# Altium PCB Membrane_Board.PcbDoc (part 2 of 5)
Units mm, origin at the board's own origin, x right, y up, seen from the top; angles counter-clockwise.
Board outline 303 x 126.06 mm, 2 copper layers (Top Layer, Bottom Layer), stack 1.499 mm thick; 248 components, 169 nets, 1258 pads, 728 vias.
Unrouted connection lines stored in the file: 317.
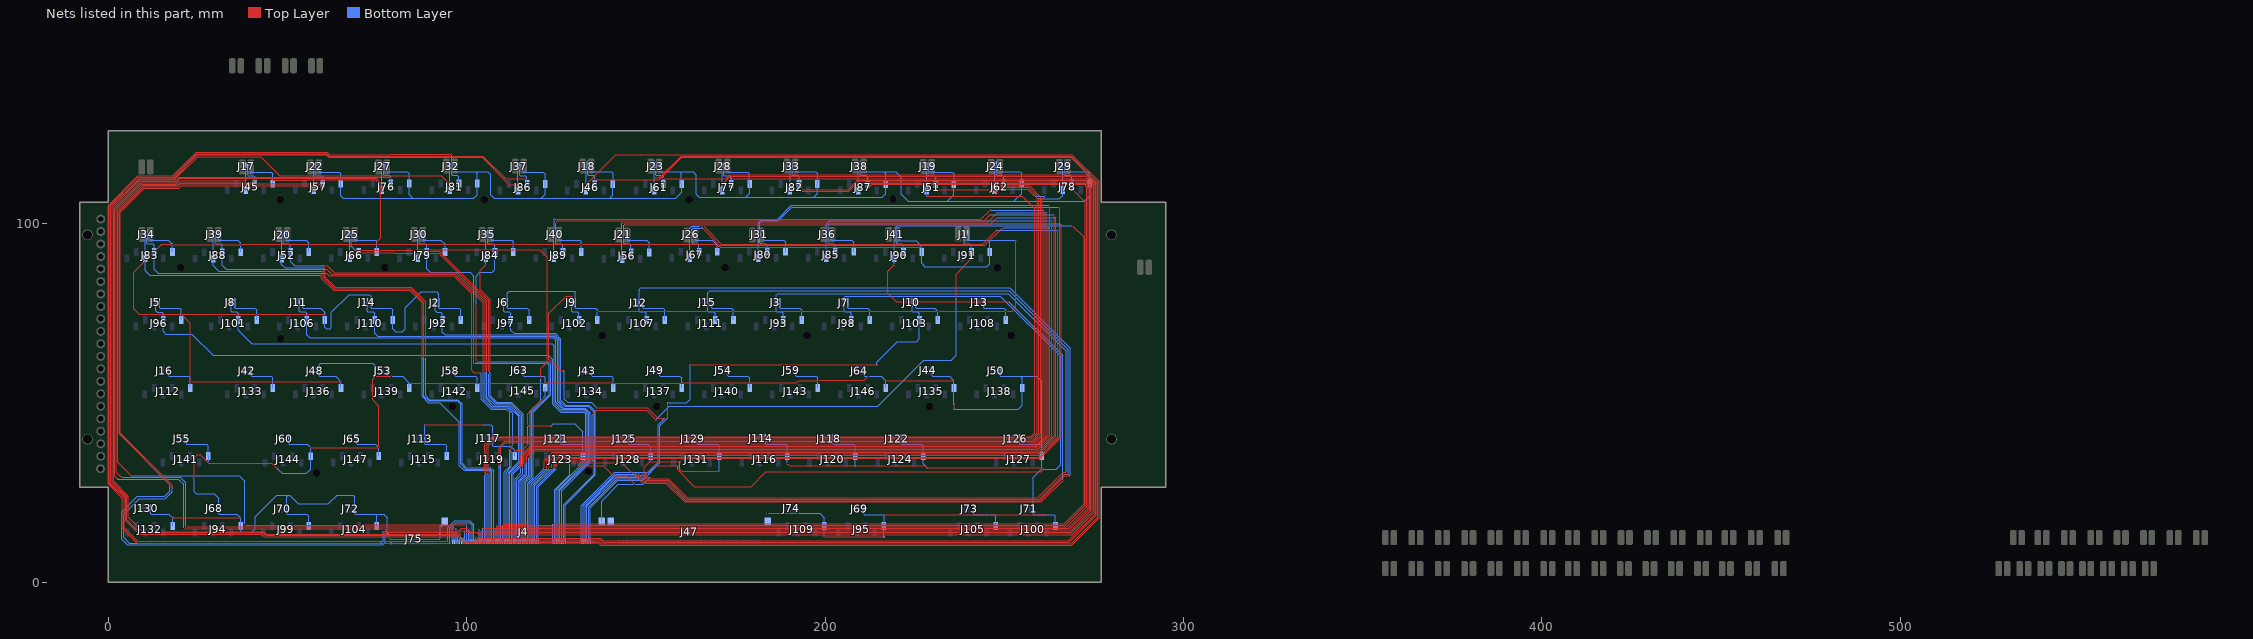
[diagram p2: the nets of this part, all layers, seen from the top]

## Via types
v1: diameter 0.4, hole 0.2, Top Layer to Bottom Layer, tented both sides, 724 vias
v2: diameter 0.4, hole 0.2, Top Layer to Bottom Layer, 3 vias
v3: diameter 0.6, hole 0.3, Top Layer to Bottom Layer, 1 vias

## Nets (pads, with @x,y where several pads share a name; then routed paths per layer and width w, separated by ;. In a path a pad name is that pad's centre, name@x,y a point inside that pad or via, vN(x,y) a via of type N, cw(c..) or ccw(c..) an arc to the next point about the centre after c; other vN are vias at no path point) (continued)
GND: J1.6 J2.6 J3.6 J4.MP1 J4.MP2 J5.6 J6.6 J7.6 J8.6 J9.6 J10.6 J11.6 J12.6 J13.6 J14.6 J15.6 J16.6 J17.6 J18.6 J19.6 J20.6 J21.6 J22.6 J23.6 J24.6 J25.6 J26.6 J27.6 J28.6 J29.6 J30.6 J31.6 J32.6 J33.6 J34.6 J35.6 J36.6 J37.6 J38.6 J39.6 J40.6 J41.6 J42.6 J43.6 J44.6 J45.6 J46.6 J47.MP1 J47.MP2 J48.6 J49.6 J50.6 J51.6 J52.6 J53.6 J54.6 J55.6 J56.6 J57.6 J58.6 J59.6 J60.6 J61.6 J62.6 J63.6 J64.6 J65.6 J66.6 J67.6 J68.6 J69.6 J70.6 J71.6 J72.6 J73.6 J74.6 J75.26 J75.MP1 J75.MP2 J76.6 J77.6 J78.6 J79.6 J80.6 J81.6 J82.6 J83.6 J84.6 J85.6 J86.6 J87.6 J88.6 J89.6 J90.6 J91.6 J92.6 J93.6 J94.6 J95.6 J96.6 J97.6 J98.6 J99.6 J100.6 J101.6 J102.6 J103.6 J104.6 J105.6 J106.6 J107.6 J108.6 J109.6 J110.6 J111.6 J112.6 J113.6 J114.6 J115.6 J116.6 J117.6 J118.6 J119.6 J120.6 J121.6 J122.6 J123.6 J124.6 J125.6 J126.6 J127.6 J128.6 J129.6 J130.6 J131.6 J132.6 J133.6 J134.6 J135.6 J136.6 J137.6 J138.6 J139.6 J140.6 J141.6 J142.6 J143.6 J144.6 J145.6 J146.6 J147.6 | length 2420.8
  Top Layer w0.203: v1@36.819,94.259 36.824,94.265 55.886,94.265 v1(55.905,94.285) v1(74.905,94.285) ; v1(45.876,112.22) 55.295,112.22 55.371,112.297 64.737,112.297 64.813,112.22 v1(64.866,112.22) ; v1@64.866,112.297 74.45,112.297 76.042,110.705 76.042,96.108 74.905,94.971 v1(74.905,94.285) ; v1(78.328,11.95) 78.332,11.946 v1(92.632,11.946) ; v1(116.936,43.7) 116.936,47.05 v1(121.167,51.28) ; v1(130.957,32.473) 138.094,32.473 140.888,29.679 144.444,29.679 v1(146.832,27.291) ; v1(151.175,29.349) 150.21,29.349 149.55,30.009 149.55,32.143 v1(151.074,33.667) v1(159.469,33.667) ; v1(159.469,31.47) 159.964,30.974 v1(170.368,30.974) ; v1(188.9,93.501) 170.743,93.501 170.529,93.715 v1(169.858,93.715) 169.306,94.266 150.89,94.266 v1(150.871,94.285) v1(131.914,94.285) v1(112.923,94.285) v1(93.898,94.285) v1(74.905,94.285) ; v1@188.9,93.592 188.991,93.501 v1(207.905,93.501) ; v1@207.905,93.592 207.996,93.501 v1(226.929,93.501)
  Top Layer w0.254: v1@17.902,17.969 v1(36.849,17.969) ; v1(23.954,28.968) 23.954,34.766 24.734,35.546 25.674,35.546 v1(27.96,33.26) 45.613,33.26 v1(47.264,31.609) ; v1(36.829,94.246) 17.884,94.246 v1(17.859,94.271) 14.904,94.271 7.112,86.479 7.112,76.257 8.631,74.738 v1(20.364,74.738) ; v1(56.383,37.527) v1(75.407,37.527) 75.407,49.186 73.705,50.888 73.705,56.65 v1(74.522,57.466) v1(78.938,57.466) ; v1(60.421,74.738) v1(41.346,74.738) v1(20.364,74.738) ; v1(64.892,56.019) v1(45.918,56.019) v1(22.871,56.019) 22.871,72.232 v1(20.364,74.738) ; v1(83.942,55.57) 83.954,55.583 102.928,55.583 v1(102.941,55.596) 121.897,55.596 v1(121.923,55.621) 140.879,55.621 v1(140.904,55.596) 159.913,55.596 v1(159.938,55.621) v1(178.936,55.621) 191.926,55.621 192.603,56.298 197.911,56.298 v1(197.937,56.323) 210.865,56.323 v1(212.034,57.492) ; v1@88.234,43.928 v1(88.244,43.928) v1(104.643,43.928) ; v1(113.363,36.842) 115.438,36.842 v1(116.936,38.34) ; v1(116.936,43.7) v1(123.489,43.7) ; v1(136.393,75.602) v1(155.239,75.602) v1(174.416,75.602) v1(193.416,75.602) v1(212.389,75.602) v1(231.389,75.602) v1(250.362,75.602) 252.191,75.602 253.131,76.542 v1(253.131,95.465) ; v1(183.865,19.189) 183.891,19.214 v1(192.273,19.214) ; v1(189.41,33.09) 190.053,32.447 v1(208.325,32.447) 227.934,32.447 v1(228.493,31.889) v1(260.394,31.889) ; v1(199.74,12.661) v3@216.393,12.661 ; v1(216.403,18.833) v1@245.98,18.833 ; v1(216.911,56.247) v1(235.91,56.247) ; v1(235.935,48.322) v1(235.935,49.719) ; v1(246.019,18.833) 261.88,18.833
  Bottom Layer w0.203: J94.6@36.849,15.729 36.849,14.237 37.155,13.931 39.974,13.931 40.914,14.871 40.914,18.223 47.01,24.319 50.236,24.319 ; J70.6@49.755,20.568 49.755,23.838 50.236,24.319 ; J57.6@64.865,111.207 64.865,107.912 65.577,107.2 84.856,107.2 ; J72.6@68.77,20.568 68.77,23.862 68.313,24.319 63.799,24.319 61.386,21.906 52.928,21.906 50.515,24.319 50.236,24.319 ; J76.6@83.9,111.311 83.9,108.155 84.856,107.2 ; v1@92.632,11.972 92.632,15.836 92.658,15.861 92.908,15.861 92.794,15.976 ; 92.933,15.417 92.933,15.836 ; J81.6@102.874,111.258 102.874,109.251 102.882,109.243 102.882,108.182 101.899,107.2 84.856,107.2 ; v1(121.167,51.28) 121.923,52.036 121.923,54.356 J145.6@121.915,54.364 ; v1(130.957,32.473) 132.345,33.86 J123.6@132.345,35.236 ; J4.MP2@137.631,16.965 137.631,22.662 142.26,27.291 v1(146.832,27.291) 149.118,27.291 v1(151.175,29.349) ; v1(151.074,33.667) 151.336,33.929 J128.6@151.336,35.236 J128.6@151.336,35.394 ; v1(159.469,31.47) v1(159.469,33.667) ; J90.6@226.926,92.208 226.926,88.954 227.833,88.048 245.028,88.048 245.9,88.92 J91.6@245.9,92.208
  Bottom Layer w0.254: J34.6@11.739,97.072 11.739,95.621 11.888,95.472 16.658,95.472 v1(17.859,94.271) J83.6@17.859,92.208 ; J130.6@11.756,20.593 11.756,19.142 11.905,18.993 16.853,18.993 v1(17.876,17.969) J132.6@17.876,15.729 ; J5.6@14.244,78.073 14.244,76.622 14.393,76.473 19.872,76.473 20.364,75.981 v1(20.364,74.738) J96.6@20.364,73.209 ; J16.6@16.751,59.074 16.751,57.623 16.899,57.474 22.379,57.474 22.871,56.982 v1(22.871,56.019) J112.6@22.871,54.21 ; J55.6@21.746,40.049 21.746,38.598 21.895,38.449 27.374,38.449 27.866,37.957 J141.6@27.866,35.185 27.96,35.092 v1(27.96,33.26) ; v1(23.954,28.968) 23.954,25.201 24.48,24.675 29.535,24.675 30.729,23.481 J68.6@30.729,20.593 30.729,19.142 30.877,18.993 35.825,18.993 v1(36.849,17.969) J94.6@36.849,15.729 ; J39.6@30.729,97.098 30.729,95.646 30.877,95.498 36.11,95.498 36.829,94.779 ; J8.6@35.226,78.073 35.226,76.622 35.375,76.473 40.854,76.473 41.346,75.981 v1(41.346,74.738) J101.6@41.346,73.209 ; J88.6@36.849,92.234 36.849,94.779 ; J17.6@39.756,116.072 39.756,114.62 39.905,114.471 45.384,114.471 45.876,113.979 v1(45.876,112.22) J45.6@45.876,111.207 ; J42.6@39.78,59.074 39.78,57.623 39.929,57.474 45.408,57.474 45.9,56.982 J133.6@45.9,54.21 ; v1(47.264,31.609) 48.509,30.365 55.138,30.365 56.383,31.609 J144.6@56.383,35.169 v1(56.383,37.527) 55.461,38.449 50.437,38.449 50.288,38.598 J60.6@50.288,40.049 ; J70.6@49.755,20.568 49.755,19.116 49.903,18.967 55.383,18.967 55.875,18.475 J99.6@55.875,15.703 ; J20.6@49.771,97.022 49.775,97.017 49.775,95.57 49.924,95.421 55.232,95.421 55.877,94.776 55.877,94.313 v1(55.905,94.285) J52.6@55.905,92.109 ; J11.6@54.266,78.073 54.266,76.622 54.415,76.473 59.245,76.473 60.386,75.332 J106.6@60.386,73.209 60.386,71.166 60.777,70.776 61.818,70.776 62.199,71.157 62.199,75.297 67.178,80.276 72.816,80.276 73.258,79.834 J14.6@73.258,78.073 73.258,76.622 73.406,76.473 78.886,76.473 79.378,75.981 J110.6@79.378,73.209 79.378,70.717 80.208,69.887 81.935,69.887 82.824,70.776 82.824,76.593 87.244,81.012 91.612,81.012 92.206,80.419 J2.6@92.206,78.048 92.206,76.596 92.355,76.448 97.834,76.448 98.326,75.956 J92.6@98.326,73.184 ; J22.6@58.745,116.072 58.745,114.62 58.894,114.471 64.373,114.471 64.865,113.979 v1@64.865,112.345 ; J57.6@64.865,111.207 64.866,111.209 v1(64.866,112.22) J57.6@64.866,112.297 ; J136.6@64.882,54.21 64.882,56.019 63.427,57.474 58.911,57.474 58.762,57.623 J48.6@58.762,59.074 58.762,60.659 59.278,61.175 73.68,61.175 74.522,60.333 v1(74.522,57.466) ; J72.6@68.77,20.568 68.77,19.116 68.919,18.967 74.112,18.967 74.119,18.96 74.405,18.96 ; J25.6@68.77,97.072 68.77,95.621 68.919,95.472 74.587,95.472 74.905,95.155 v1(74.905,94.285) 74.905,92.223 J66.6@74.89,92.208 ; J65.6@69.286,40.075 69.286,38.623 69.435,38.475 74.459,38.475 75.406,37.527 J147.6@75.406,35.211 ; J104.6@74.89,15.703 74.89,18.475 74.405,18.96 ; J27.6@77.78,116.097 77.78,114.646 77.929,114.497 83.408,114.497 83.9,114.005 J76.6@83.9,111.311 ; J53.6@77.822,59.049 77.822,57.597 77.97,57.448 v1@78.938,57.448 ; 78.1,12.889 77.795,13.194 77.795,18.02 76.855,18.96 74.405,18.96 ; v1(78.938,57.466) 82.046,57.466 v1(83.942,55.57) J139.6@83.942,54.184 ; J30.6@87.786,97.072 87.791,97.068 87.791,95.621 87.94,95.472 92.719,95.472 93.906,94.285 J79.6@93.906,92.208 ; J113.6@88.228,40.084 88.228,38.617 88.377,38.467 93.904,38.467 94.364,38.008 J115.6@94.364,35.236 ; J113.6@88.244,40.1 v1(88.244,43.928) ; J32.6@96.754,116.122 96.758,116.118 96.758,114.671 96.907,114.522 102.382,114.522 ; J58.6@96.821,59.074 96.821,57.623 96.97,57.474 102.449,57.474 102.941,56.982 v1(102.941,55.596) J142.6@102.941,54.21 ; J81.6@102.874,111.258 102.874,114.03 102.382,114.522 ; v1(104.643,43.928) 106.675,43.928 107.243,43.36 J117.6@107.243,40.126 107.243,38.083 107.392,37.934 112.271,37.934 v1(113.363,36.842) J119.6@113.363,35.261 ; J35.6@106.811,97.072 106.815,97.068 106.815,95.621 106.964,95.472 112.662,95.472 112.931,95.203 J84.6@112.931,92.208 ; J37.6@115.753,116.046 115.753,114.595 115.902,114.446 121.381,114.446 121.873,113.954 J86.6@121.873,111.182 ; J63.6@115.803,59.099 115.803,57.648 115.951,57.499 121.431,57.499 121.923,57.007 v1(121.923,55.621) ; v1(116.936,38.34) v1(116.936,43.7) ; J97.6@117.376,73.234 117.376,76.006 116.884,76.498 111.405,76.498 111.256,76.647 J6.6@111.256,78.099 111.256,80.59 111.831,81.165 130.093,81.165 130.273,80.985 J9.6@130.273,78.073 130.273,76.622 130.421,76.473 135.901,76.473 136.393,75.981 v1(136.393,75.602) J102.6@136.393,73.209 ; J86.6@121.889,111.166 121.889,108.266 120.746,107.123 ; v1(123.489,43.7) 124.048,44.258 130.068,44.258 132.345,41.982 132.345,38.008 ; J40.6@125.794,97.072 125.799,97.068 125.799,95.621 125.947,95.472 131.686,95.472 131.914,95.244 v1(131.914,94.285) J89.6@131.914,92.208 ; J121.6@126.225,40.1 126.225,38.649 126.373,38.5 131.853,38.5 132.345,38.008 ; J123.6@132.345,35.236 132.345,38.008 ; J18.6@134.751,116.122 134.751,114.671 134.9,114.522 140.379,114.522 140.871,114.03 J46.6@140.871,111.258 ; J43.6@134.784,59.074 134.784,57.623 134.933,57.474 140.412,57.474 140.904,56.982 v1(140.904,55.596) J134.6@140.904,54.21 ; J46.6@140.761,111.166 140.761,108.038 139.847,107.123 ; J21.6@144.741,97.072 144.746,97.068 144.746,95.621 144.894,95.472 150.168,95.472 150.861,94.779 J56.6@150.861,92.208 ; J125.6@145.216,40.1 145.216,38.649 145.365,38.5 150.508,38.5 151.336,37.672 J128.6@151.336,35.394 ; J12.6@149.119,77.997 149.119,76.546 149.268,76.397 154.747,76.397 155.239,75.905 v1(155.239,75.602) J107.6@155.239,73.133 ; J23.6@153.768,116.097 153.768,114.646 153.916,114.497 159.396,114.497 ; J49.6@153.818,59.099 153.818,57.648 153.967,57.499 159.446,57.499 159.938,57.007 v1(159.938,55.621) J137.6@159.938,54.235 ; J26.6@163.758,97.098 163.758,95.577 163.907,95.428 168.504,95.428 169.878,94.054 J67.6@169.878,92.234 ; J129.6@164.248,40.1 164.248,38.649 164.397,38.5 169.876,38.5 170.368,38.008 J131.6@170.368,35.236 v1(170.368,30.974) ; J15.6@168.279,78.073 168.279,76.622 168.428,76.473 173.907,76.473 174.399,75.981 J111.6@174.399,73.209 ; J28.6@172.7,116.021 172.7,114.569 172.849,114.421 178.328,114.421 178.82,113.929 J77.6@178.82,111.157 ; J54.6@172.816,59.099 172.816,57.648 172.965,57.499 178.444,57.499 178.936,57.007 v1(178.936,55.621) J140.6@178.936,54.235 ; J77.6@178.912,111.166 178.912,108.495 177.82,107.403 ; J31.6@182.8,97.098 182.8,95.646 182.949,95.498 188.428,95.498 188.92,95.006 188.92,93.521 v1(188.9,93.501) ; J114.6@183.29,40.126 183.29,38.674 183.439,38.525 188.918,38.525 189.41,38.033 J116.6@189.41,35.261 v1(189.41,33.09) ; J47.MP2@183.865,17.009 J47.MP2@183.91,16.965 ; J3.6@187.28,78.073 187.28,76.622 187.428,76.473 192.908,76.473 193.4,75.981 J93.6@193.4,73.209 ; J80.6@188.92,92.234 v1@188.92,93.501 ; J33.6@191.75,116.122 191.75,114.671 191.899,114.522 197.378,114.522 197.87,114.03 J82.6@197.87,111.258 ; J59.6@191.815,59.099 191.815,57.648 191.964,57.499 197.443,57.499 197.935,57.007 J143.6@197.935,54.235 ; v1(192.273,19.214) 198.521,19.214 199.758,17.977 J109.6@199.758,15.729 199.74,15.711 v1(199.74,12.661) ; J82.6@197.759,111.166 197.759,108.419 196.743,107.403 ; J36.6@201.782,97.098 201.782,95.646 201.93,95.498 207.41,95.498 207.905,95.002 v1(207.905,93.501) ; J118.6@202.197,40.1 202.197,38.649 202.346,38.5 207.825,38.5 208.317,38.008 J120.6@208.317,35.236 ; J7.6@206.279,78.048 206.279,76.596 206.428,76.448 211.907,76.448 212.399,75.956 J98.6@212.399,73.184 ; J85.6@207.902,92.234 v1@207.902,93.501 ; v1(208.325,32.447) J120.6@208.325,35.228 ; J38.6@210.705,116.122 210.705,114.671 210.854,114.522 216.333,114.522 ; J69.6@210.807,20.568 210.807,19.085 211.058,18.833 v1(216.403,18.833) 216.403,15.738 J95.6@216.393,15.729 v3(216.393,12.67) ; J64.6@210.807,59.074 210.829,59.052 210.829,57.641 210.978,57.492 v1(212.034,57.492) 215.666,57.492 v1(216.911,56.247) 216.911,54.226 J146.6@216.927,54.21 ; J87.6@216.825,111.258 216.825,114.03 216.333,114.522 ; J87.6@216.885,111.166 216.885,108.393 215.895,107.403 196.743,107.403 ; J41.6@220.806,97.072 220.811,97.067 220.811,95.622 221.158,95.275 225.355,95.275 226.529,94.101 226.529,93.922 226.929,93.521 v1(226.929,93.501) ; J122.6@221.23,40.075 221.23,38.623 221.379,38.475 226.858,38.475 227.35,37.983 J124.6@227.35,35.211 227.35,33.032 v1(228.493,31.889) ; J10.6@225.261,78.073 225.261,76.622 225.409,76.473 230.51,76.473 231.381,75.602 J103.6@231.381,73.209 ; J90.6@226.926,92.208 v1@226.926,93.501 ; J44.6@229.814,59.099 229.814,57.648 229.963,57.499 234.682,57.499 v1@235.934,56.247 ; J19.6@229.815,116.046 229.815,114.595 229.964,114.446 235.443,114.446 235.935,113.954 J51.6@235.935,111.182 ; J51.6@235.884,111.166 235.91,111.141 235.91,108.097 234.086,106.274 ; v1(235.91,56.247) 235.91,54.259 J135.6@235.934,54.235 v1@235.934,49.719 ; v1(235.935,48.322) 253.918,48.322 254.934,49.338 J138.6@254.934,54.21 254.934,56.982 254.442,57.474 ; J1.6@239.78,97.072 239.78,95.621 239.929,95.472 245.408,95.472 ; J73.6@241.423,20.568 241.423,18.982 241.572,18.833 v1(246.019,18.833) 247.185,18.833 247.543,18.475 J105.6@247.543,15.729 ; J13.6@244.242,78.073 244.242,76.622 244.391,76.473 249.87,76.473 250.362,75.981 v1(250.362,75.602) J108.6@250.362,73.209 ; J91.6@245.9,92.208 245.9,94.98 245.408,95.472 ; J24.6@248.73,116.148 248.73,114.696 248.879,114.548 254.358,114.548 254.85,114.056 J62.6@254.85,111.284 254.85,108.462 252.789,106.401 ; J50.6@248.814,59.074 248.814,57.623 248.963,57.474 254.442,57.474 ; v1(253.131,95.465) 253.124,95.472 245.408,95.472 ; J126.6@254.274,40.075 254.274,38.623 254.423,38.475 259.902,38.475 260.394,37.983 ; J71.6@258.085,20.577 258.085,18.982 258.234,18.833 v1(262.097,18.833) 263.857,18.833 264.205,18.485 J100.6@264.205,15.791 ; J71.6@258.095,20.568 258.095,29.359 260.394,31.659 v1(260.394,31.889) J127.6@260.394,35.211 260.394,37.983 ; J29.6@267.737,116.122 267.737,114.671 267.886,114.522 273.365,114.522 273.857,114.03 J78.6@273.857,111.258 273.908,111.207 273.908,107.843 272.466,106.401 ; 272.466,106.274 234.086,106.274 ; 102.382,114.522 105.88,114.522 106.649,113.753 106.649,108.089 107.614,107.123 120.746,107.123 ; 120.746,107.123 139.847,107.123 ; 139.847,107.123 158.262,107.123 159.938,108.8 J61.6@159.938,111.166 159.938,111.182 159.888,111.233 159.888,114.005 159.396,114.497 ; 159.396,114.497 163.131,114.497 164.028,113.6 164.028,108.266 164.891,107.403 177.82,107.403 ; 177.82,107.403 196.743,107.403 ; 216.333,114.522 219.716,114.522 221.183,113.055 221.183,108.229 223.139,106.274 234.086,106.274 ; 254.442,57.474 259.042,57.474 260.394,56.122 260.394,37.983
I2C1.SCL_1: J4.9 J17.4 J45.4 | length 235
  Top Layer w0.203: v1(6.319,29.74) 2.565,33.494 2.565,103.657 9.652,110.744 19.05,110.744 19.837,111.531 40.066,111.531 v1(40.755,112.22) ; v1(37.942,16.039) 37.98,16.001 38.342,16.001 38.425,15.918 69.118,15.918 69.217,16.017 v1(99.969,16.017)
  Bottom Layer w0.203: v1(6.319,29.74) 36.484,29.74 37.968,28.256 37.968,16.064 v1(37.942,16.039) ; J4.9@99.969,11.327 99.975,11.333 99.975,16.011 v1(99.969,16.017)
  Bottom Layer w0.254: J17.4@38.756,116.072 38.756,113.655 38.905,113.506 40.349,113.506 40.755,113.1 J45.4@40.755,111.249
I2C1.SCL_2: J4.10 J22.4 J57.4 | length 279.2
  Top Layer w0.203: v1(17.163,26.596) 17.163,27.185 2.946,41.402 2.946,103.5 9.784,110.338 19.253,110.338 20.066,111.15 58.612,111.15 v1(59.743,110.019) ; v1(77.211,13.934) 97.28,13.934 98.394,15.048 v1(100.481,15.048)
  Bottom Layer w0.203: J4.10@100.481,11.315 v1(100.481,15.048) v1@100.481,15.062
  Bottom Layer w0.254: v1(17.163,26.596) 17.163,25.384 15.766,23.987 8.095,23.987 3.652,19.544 3.652,12 5.202,10.451 76.499,10.451 77.211,11.162 v1(77.211,13.934) ; J22.4@57.745,116.072 57.745,113.655 57.894,113.506 59.337,113.506 59.743,113.1 J57.4@59.743,111.249
I2C1.SCL_3: J4.11 J27.4 J76.4 | length 276.4
  Top Layer w0.203: v1(78.779,112.739) 78.749,112.739 78.407,113.081 19.705,113.081 18.511,111.887 8.941,111.887 1.422,104.369 1.422,28.154 5.563,24.014 5.563,18.147 9.55,14.159 43.302,14.159 44.006,13.455 97.461,13.455 98.445,14.439 v1(100.985,14.439)
  Bottom Layer w0.203: J4.11@100.981,11.315 100.981,14.435 v1(100.985,14.439)
  Bottom Layer w0.254: J27.4@76.78,116.097 76.78,113.68 76.929,113.532 78.372,113.532 78.779,113.125 v1(78.779,112.739) J76.4@78.779,111.274
I2C1.SCL_4: J4.12 J32.4 J81.4 | length 312.7
  Top Layer w0.203: v1(95.27,10.959) 7.964,10.959 3.912,15.011 3.912,23.47 -0.102,27.483 -0.102,105.091 8.219,113.411 17.88,113.411 24.484,120.015 61.047,120.015 61.758,119.304 78.667,119.304 78.765,119.402 v1(95.727,119.402)
  Bottom Layer w0.203: v1@95.27,11.01 95.27,15.023 96.87,16.623 100.807,16.623 101.481,15.949 J4.12@101.481,11.315 ; v1(95.727,119.402) 95.727,117.817 95.741,117.803 95.741,116.136 J32.4@95.754,116.122
  Bottom Layer w0.254: J32.4@95.754,116.122 95.754,113.706 95.903,113.557 97.346,113.557 97.753,113.151 J81.4@97.753,111.3
I2C1.SCL_5: J4.13 J37.4 J86.4 | length 332.3
  Top Layer w0.203: v1(94.686,11.442) 8.116,11.442 4.343,15.215 4.343,23.577 0.279,27.641 0.279,104.933 8.377,113.03 18.038,113.03 24.642,119.634 60.889,119.634 61.6,118.923 104.47,118.923 110.799,112.594 v1(116.768,112.594)
  Bottom Layer w0.203: v1@94.686,11.492 94.686,15.201 96.674,17.189 100.825,17.189 101.981,16.033 J4.13@101.981,11.315
  Bottom Layer w0.254: J37.4@114.753,116.046 114.753,113.63 114.902,113.481 116.345,113.481 116.752,113.074 J86.4@116.752,111.223
I2C1.SCL_6: J4.14 J18.4 J46.4 | length 423.4
  Top Layer w0.203: v1(102.484,12.585) 102.484,11.974 102.635,11.823 137.18,11.823 137.859,11.143 268.149,11.143 275.666,18.661 275.666,111.392 268.491,118.567 248.762,118.567 248.743,118.548 190.742,118.548 190.723,118.567 172.721,118.567 172.702,118.548 171.674,118.548 171.655,118.567 159.969,118.567 153.732,112.33 v1(135.75,112.33)
  Bottom Layer w0.203: v1@102.433,12.686 102.457,12.662 102.457,11.339 J4.14@102.48,11.316
  Bottom Layer w0.254: J18.4@133.751,116.122 133.751,113.706 133.9,113.557 135.343,113.557 135.75,113.151 v1(135.75,112.33) J46.4@135.75,111.3
I2C1.SCL_7: J4.15 J23.4 J61.4 | length 397.5
  Top Layer w0.203: v1(102.992,12.305) 137.332,12.305 138.113,11.524 267.844,11.524 275.285,18.965 275.285,111.234 272.828,113.69 173.38,113.69 172.325,112.635 v1(154.808,112.635)
  Bottom Layer w0.203: J4.15@102.981,11.315 v1@102.981,12.432
  Bottom Layer w0.254: J23.4@152.768,116.097 152.768,113.68 152.916,113.532 154.36,113.532 154.78,113.112 154.78,112.663 v1(154.808,112.635) J61.4@154.808,111.316
I2C1.SCL_8: J4.16 J28.4 J77.4 | length 376.7
  Top Layer w0.203: v1(103.474,14.617) 103.474,13.989 103.71,13.753 268.65,13.753 274.523,19.626 274.523,110.918 272.89,112.551 v1(173.732,112.551)
  Bottom Layer w0.203: J4.16@103.474,11.322 v1(103.474,14.617)
  Bottom Layer w0.254: J28.4@171.7,116.021 171.7,113.604 171.849,113.455 173.292,113.455 173.699,113.049 v1@173.699,112.584 ; J77.4@173.699,111.198 173.732,111.231 v1(173.732,112.551)
I2C1.SCL_9: J4.25 J33.4 J82.4 | length 353
  Top Layer w0.203: v1(107.995,14.642) 268.092,14.642 273.761,20.312 273.761,110.602 272.574,111.789 209.274,111.789 206.564,109.079 v1(192.749,109.079)
  Bottom Layer w0.203: J4.25@107.981,11.315 v1@107.981,14.656 ; J82.4@192.679,111.166 192.749,111.096 v1(192.749,109.079)
  Bottom Layer w0.254: J33.4@190.75,116.122 190.75,113.706 190.899,113.557 192.342,113.557 192.749,113.151 J82.4@192.749,111.3
I2C1.SCL_10: J4.26 J38.4 J87.4 | length 330.8
  Top Layer w0.203: v1(108.478,15.702) 116.314,15.702 116.511,15.506 267.38,15.506 272.999,21.124 272.999,110.287 272.259,111.027 213.152,111.027 v1(211.78,109.655)
  Bottom Layer w0.203: v1@108.478,15.728 108.481,15.725 J4.26@108.481,11.315
  Bottom Layer w0.254: J38.4@209.705,116.122 209.705,113.706 209.854,113.557 211.297,113.557 211.805,113.049 J87.4@211.805,111.166 ; v1(211.78,109.655) J87.4@211.78,111.166
I2C1.SCL_11: J4.27 J19.4 J51.4 | length 284.5
  Top Layer w0.203: v1(109.011,32.168) 109.011,37.812 110.581,39.382 258.025,39.382 260.192,41.549 260.192,107.473 257.019,110.646 248.975,110.646 247.89,109.562 v1(230.814,109.562)
  Bottom Layer w0.203: J4.27@108.983,11.317 109.009,11.342 109.009,32.14 v1@109.037,32.168
  Bottom Layer w0.254: J19.4@228.815,116.046 228.815,113.63 228.964,113.481 230.407,113.481 230.814,113.074 v1(230.814,109.562)
I2C1.SCL_12: J4.28 J24.4 J62.4 | length 266.4
  Top Layer w0.203: v1(109.519,32.752) 109.519,37.705 110.764,38.95 258.228,38.95 260.624,41.346 260.624,106.827 v1(261.468,107.671)
  Top Layer w0.254: v1(249.78,109.667) 256.449,109.667 v1(258.42,107.696)
  Bottom Layer w0.203: J4.28@109.481,11.315 109.5,11.334 109.5,32.733 v1(109.519,32.752)
  Bottom Layer w0.254: J24.4@247.73,116.148 247.73,113.731 247.879,113.582 249.315,113.582 249.78,113.118 v1(249.78,109.667) ; v1(258.42,107.696) 261.442,107.696 v1(261.468,107.671)
I2C1.SCL_13: J4.29 J29.4 J78.4 | length 267.9
  Top Layer w0.203: v1(109.981,16.196) 116.93,16.196 117.24,15.887 266.974,15.887 272.618,21.531 272.618,106.02 v1(268.808,109.83)
  Bottom Layer w0.203: J4.29@109.981,11.315 v1(109.981,16.196) v1@109.981,16.221
  Bottom Layer w0.254: J29.4@266.737,116.122 266.737,113.706 266.886,113.557 268.33,113.557 268.752,113.135 268.752,111.258 268.808,111.202 v1(268.808,109.83)
I2C1.SCL_14: J4.30 J34.4 J83.4 | length 180.6
  Top Layer w0.203: v1(60.929,86.168) 61.539,85.559 96.286,85.559 101.315,80.53 101.315,59.117 101.976,58.457 v1(104.075,58.457) ; v1(111.907,37.273) v1(111.907,38.442)
  Bottom Layer w0.203: J83.4@12.779,92.208 12.779,87.303 13.914,86.168 v1(60.929,86.168) ; v1(104.075,58.457) 104.075,51.072 106.85,48.297 111.018,48.297 111.907,47.408 v1(111.907,38.442) ; J4.30@110.483,11.317 110.483,30.871 111.907,32.295 v1(111.907,37.273)
  Bottom Layer w0.254: J34.4@10.739,97.072 10.739,94.656 10.888,94.507 12.331,94.507 12.737,94.101 J83.4@12.737,92.25 ; J83.4@12.779,92.208 J83.4@12.779,92.224
I2C1.SCL_15: J4.31 J39.4 J88.4 | length 161.9
  Top Layer w0.203: v1(60.929,87.286) 62.275,85.94 96.598,85.94 104.573,77.964 v1(104.573,58.882) ; v1(112.415,36.74) 112.415,38.01 112.821,38.416 v1(112.847,38.416)
  Bottom Layer w0.203: J88.4@31.745,92.275 31.745,88.413 32.872,87.286 v1(60.929,87.286) ; v1(104.573,58.882) 104.573,51.279 107.148,48.703 111.374,48.703 112.847,47.23 v1(112.847,38.416) ; J4.31@110.981,11.315 110.981,30.734 112.415,32.168 v1(112.415,36.74)
  Bottom Layer w0.254: J39.4@29.729,97.098 29.729,94.681 29.877,94.532 31.321,94.532 31.727,94.126 J88.4@31.727,92.275 ; J88.4@31.745,92.275 31.745,93.318
I2C1.SCL_16: J4.32 J20.4 J52.4 | length 142.6
  Top Layer w0.203: v1(59.889,88.294) 61.064,88.294 63.037,86.321 96.921,86.321 97.213,86.029 105.071,78.171 v1(105.071,58.457)
  Bottom Layer w0.203: J52.4@50.795,92.167 50.795,89.429 51.942,88.281 56.423,88.281 56.435,88.294 v1(59.889,88.294) ; v1@105.075,58.457 105.075,51.487 107.426,49.135 111.577,49.135 114.437,46.275 114.437,33.579 114.318,33.46 ; J4.32@111.483,11.317 111.483,30.627 114.317,33.46
  Bottom Layer w0.254: J20.4@48.771,97.022 48.771,94.605 48.919,94.456 50.363,94.456 50.769,94.05 J52.4@50.769,92.199
I2C1.SCL_17: J4.41 J25.4 J66.4 | length 142.6
  Top Layer w0.203: v1(68.834,92.685) 85.958,92.685 86.085,92.812 120.275,92.812 122.448,90.639 122.448,61.403 120.568,59.524 v1(120.568,56.831)
  Bottom Layer w0.203: J4.41@115.981,11.315 115.981,28.038 117.729,29.786 117.729,47.845 120.568,50.685 v1(120.568,56.831)
  Bottom Layer w0.254: J25.4@67.77,97.072 67.77,93.749 v1(68.834,92.685) 69.333,92.685 J66.4@69.81,92.208
I2C1.SCL_18: J4.42 J30.4 J79.4 | length 122.8
  Top Layer w0.203: v1(101.976,61.073) v1(101.976,78.04)
  Bottom Layer w0.203: J79.4@88.826,92.208 88.826,87.43 89.809,86.448 100.985,86.448 101.976,85.457 v1(101.976,78.04) ; v1(101.976,61.073) 122.473,61.073 122.956,60.591 122.956,52.392 118.11,47.546 118.11,29.506 116.481,27.878 J4.42@116.481,11.315
  Bottom Layer w0.254: J30.4@86.786,97.072 86.786,94.656 86.935,94.507 88.379,94.507 88.785,94.101 J79.4@88.785,92.25
I2C1.SCL_19: J4.43 J35.4 J84.4 | length 114.7
  Top Layer w0.254: v1(102.611,61.556) v1(102.611,77.507)
  Bottom Layer w0.203: v1(102.611,61.556) 122.727,61.556 123.439,60.845 123.439,52.336 118.491,47.388 118.491,29.227 116.964,27.7 J4.43@116.964,11.315
  Bottom Layer w0.254: v1(102.611,77.507) 102.611,85.457 103.601,86.448 107.157,86.448 107.851,87.142 J84.4@107.851,92.208 ; J35.4@105.811,97.072 105.811,94.656 105.96,94.507 107.403,94.507 107.81,94.101 J84.4@107.81,92.25
I2C1.SCL_20: J4.44 J40.4 J89.4 | length 380.8
  Top Layer w0.203: v1(121.635,31.711) 121.635,33.971 123.896,36.232 259.32,36.232 263.774,40.685 v1(263.774,102.526) ; v1(124.81,100.392) 125.267,100.85 244.419,100.85 v1(246.095,102.526)
  Bottom Layer w0.203: J4.44@117.481,11.315 117.481,27.557 v1(121.635,31.711) ; J40.4@124.794,97.072 124.794,100.376 v1(124.81,100.392) ; v1(246.095,102.526) v1(263.774,102.526)
  Bottom Layer w0.254: J40.4@124.794,97.072 124.794,94.656 124.943,94.507 126.386,94.507 126.793,94.101 J89.4@126.793,92.25
I2C1.SCL_21: J4.45 J21.4 J56.4 | length 360.8
  Top Layer w0.203: v1(122.321,31.711) 122.321,33.921 124.226,35.826 259.493,35.826 264.383,40.716 v1@264.383,101.662 ; v1@143.759,99.783 245.943,99.783 v1(247.873,101.713) v1@247.899,101.713
  Bottom Layer w0.203: J4.45@117.981,11.34 117.979,11.342 117.979,27.369 v1(122.321,31.711) ; J21.4@143.741,97.072 v1@143.741,99.765 ; v1@247.899,101.713 264.332,101.713 v1@264.383,101.662
  Bottom Layer w0.254: J21.4@143.741,97.072 143.741,94.656 143.89,94.507 145.333,94.507 145.74,94.101 J56.4@145.74,92.25
  other v1: 143.733,99.783 264.383,101.688
I2C1.SCL_22: J4.46 J26.4 J67.4 | length 340.5
  Top Layer w0.203: v1(122.981,31.736) 122.981,33.819 124.556,35.394 259.6,35.394 264.866,40.66 v1@264.866,98.259 ; v1(166.039,99.283) 170.96,94.361 243.968,94.361 v1(247.882,98.275)
  Bottom Layer w0.203: J4.46@118.486,11.319 118.486,27.19 v1@123.032,31.736 ; J26.4@162.758,97.098 162.791,97.131 162.791,98.514 163.069,98.792 165.548,98.792 v1(166.039,99.283) ; v1(247.882,98.275) 247.886,98.272 264.853,98.272 v1@264.86,98.265
  Bottom Layer w0.254: J26.4@162.758,97.098 162.758,94.951 163.176,94.532 164.35,94.532 164.756,94.126 J67.4@164.756,92.275
  other v1: 264.885,98.265
I2C1.SCL_23: J4.47 J31.4 J80.4 | length 328
  Top Layer w0.203: v1(123.667,31.736) 123.667,33.616 124.988,34.937 259.777,34.937 265.399,40.558 v1(265.399,104.66)
  Bottom Layer w0.203: J4.47@118.981,11.34 118.981,27.05 v1(123.667,31.736) ; J31.4@181.8,97.098 181.8,100.257 182.367,100.824 186.862,100.824 190.698,104.66 v1(265.399,104.66)
  Bottom Layer w0.254: J31.4@181.8,97.098 181.8,94.681 181.949,94.532 183.392,94.532 183.798,94.126 J80.4@183.798,92.275
I2C1.SCL_24: J4.48 J36.4 J85.4 | length 302.5
  Top Layer w0.203: v1(124.328,31.711) 124.328,33.438 125.445,34.556 259.955,34.556 265.907,40.508 v1@265.907,100.073
  Bottom Layer w0.203: J4.48@119.481,11.34 119.481,26.864 v1(124.328,31.711) ; J36.4@200.782,97.098 200.782,99.732 201.137,100.088 v1@265.806,100.088
  Bottom Layer w0.254: J36.4@200.782,97.098 200.782,94.681 200.93,94.532 202.374,94.532 202.78,94.126 J85.4@202.78,92.275
  other v1: 265.907,100.088
I2C1.SCL_25: J4.57 J41.4 J90.4 | length 292.4
  Top Layer w0.203: v1(123.981,16.366) 266.768,16.366 267.085,16.683 ; 267.085,16.709 272.237,21.861 272.237,96.247 v1(268.93,99.554)
  Bottom Layer w0.203: J4.57@123.981,11.315 v1(123.981,16.366) ; J41.4@219.806,97.072 219.806,99.199 220.162,99.554 v1(268.93,99.554)
  Bottom Layer w0.254: J41.4@219.806,97.072 219.806,94.849 220.148,94.507 221.398,94.507 221.805,94.101 J90.4@221.805,92.25
I2C1.SDA_1: J4.1 J17.3 J45.3 | length 231.6
  Top Layer w0.203: v1(3.627,29.261) 2.184,30.703 2.184,103.957 9.353,111.125 18.827,111.125 19.716,112.014 v1@38.244,112.014 ; v1(21.61,15.504) 67.25,15.504 ; 67.251,15.505 v1(96.515,15.506)
  Bottom Layer w0.203: v1(3.627,29.261) 20.072,29.261 21.61,27.723 v1(21.61,15.504) ; J4.1@95.981,11.315 95.981,14.972 v1(96.515,15.506)
  Bottom Layer w0.254: v1@38.247,112.112 38.247,109.417 J45.3@38.256,109.407 ; v1@38.252,112.056 38.252,116.067 J17.3@38.256,116.072
  other v1: 38.247,112.011
I2C1.SDA_2: J4.2 J22.3 J57.3 | length 269.2
  Top Layer w0.203: v1(17.736,26.198) 17.753,26.216 17.753,27.134 3.327,41.56 3.327,103.226 10.008,109.906 19.609,109.906 20.374,110.671 v1(57.245,110.671) ; v1(76.677,14.413) v1(96.489,14.413)
  Bottom Layer w0.203: J4.2@96.481,11.315 96.485,11.319 96.485,14.409 v1(96.489,14.413)
  Bottom Layer w0.254: v1(17.736,26.198) 17.736,25.22 15.793,23.278 8.58,23.278 4.236,18.935 4.236,12.534 5.862,10.908 75.864,10.908 76.677,11.721 v1(76.677,14.413) ; J57.3@57.245,109.407 J22.3@57.245,116.072
I2C1.SDA_3: J4.3 J27.3 J76.3 | length 272
  Top Layer w0.203: v1@2.652,28.768 2.652,28.788 1.803,29.636 1.803,104.115 9.195,111.506 18.669,111.506 19.863,112.7 74.694,112.7 76.264,111.129 v1(76.296,111.129) ; v1(21,14.971) 96.945,14.971 v1(96.972,14.998)
  Bottom Layer w0.203: v1(2.662,28.778) 19.513,28.778 21,27.291 v1(21,14.971) ; J4.3@96.981,11.315 v1@96.981,15.007
  Bottom Layer w0.254: J76.3@76.28,109.511 76.296,109.527 v1(76.296,111.129) ; v1@76.28,111.113 J27.3@76.28,116.097
I2C1.SDA_4: J4.4 J32.3 J81.3 | length 296.8
  Top Layer w0.203: v1(95.269,111.113) 92.92,113.462 47.803,113.462 42.469,118.796 24.881,118.796 18.353,112.268 8.692,112.268 1.041,104.617 1.041,27.996 5.156,23.881 5.156,17.45 8.788,13.818 8.788,13.778 43.124,13.778 43.829,13.074 97.994,13.074 v1(98.47,13.55)
  Bottom Layer w0.203: J4.4@97.481,11.315 97.481,12.56 v1(98.47,13.55)
  Bottom Layer w0.254: J81.3@95.254,109.458 J32.3@95.254,116.122
I2C1.SDA_5: J4.5 J37.3 J86.3 | length 315.3
  Top Layer w0.203: v1(97.988,12.356) 97.935,12.356 97.61,12.681 43.535,12.681 42.819,13.397 8.548,13.397 4.775,17.17 4.775,23.724 0.66,27.838 0.66,104.775 8.534,112.649 18.196,112.649 24.8,119.253 60.731,119.253 61.443,118.542 104.312,118.542 111.886,110.968 v1(114.269,110.968)
  Bottom Layer w0.203: J4.5@97.981,11.315 97.985,11.318 v1@97.985,12.356
  Bottom Layer w0.254: J86.3@114.253,109.382 J37.3@114.253,116.046
I2C1.SDA_6: J4.6 J18.3 J46.3 | length 434.2
  Top Layer w0.203: v1(98.47,12.762) 98.47,11.873 99.359,10.984 136.723,10.984 137.326,10.381 268.789,10.381 276.428,18.02 276.428,111.707 268.806,119.329 248.446,119.329 248.427,119.31 191.058,119.31 191.039,119.329 172.405,119.329 172.386,119.31 171.989,119.31 171.97,119.329 153.492,119.329 153.473,119.31 153.076,119.31 153.057,119.329 141.52,119.329 v1(133.251,111.06)
  Bottom Layer w0.203: J4.6@98.47,11.315 98.476,11.32 98.476,12.757 v1(98.47,12.762)
  Bottom Layer w0.254: J46.3@133.251,109.458 v1(133.251,111.06) J18.3@133.251,116.122
I2C1.SDA_7: J4.7 J23.3 J61.3 | length 412.8
  Top Layer w0.203: v1(98.978,12.331) 99.936,11.374 136.918,11.374 137.529,10.762 268.631,10.762 276.047,18.178 276.047,111.549 268.648,118.948 248.604,118.948 248.585,118.929 190.9,118.929 190.881,118.948 172.563,118.948 172.544,118.929 171.831,118.929 171.812,118.948 159.791,118.948 153.732,112.889 v1(152.258,112.889)
  Bottom Layer w0.203: v1(98.978,12.331) 98.98,12.329 98.98,11.316 J4.7@98.981,11.315 ; 152.258,117.715 152.263,117.711 152.263,116.102 J23.3@152.268,116.097
  Bottom Layer w0.254: J23.3@152.268,116.097 152.28,116.084 152.28,110.946 152.293,110.933 J61.3@152.293,109.458
I2C1.SDA_8: J4.8 J28.3 J77.3 | length 384.7
  Top Layer w0.203: v1(99.461,13.905) 102.687,13.905 103.322,13.27 268.803,13.27 274.904,19.372 274.904,111.076 272.743,113.237 173.478,113.237 v1(171.2,110.959)
  Bottom Layer w0.203: v1(99.461,13.905) 99.461,11.335 J4.8@99.481,11.315
  Bottom Layer w0.254: J77.3@171.2,109.357 v1(171.2,110.959) J28.3@171.2,116.021
I2C1.SDA_9: J4.17 J33.3 J82.3 | length 359.1
  Top Layer w0.203: v1(103.982,14.232) 107.727,14.232 107.8,14.159 268.32,14.159 274.142,19.981 274.142,110.76 272.732,112.17 208.995,112.17 206.4,109.576 191.735,109.576 v1(190.25,111.06)
  Bottom Layer w0.203: J4.17@103.981,11.315 v1(103.982,14.232)
  Bottom Layer w0.254: J82.3@190.25,109.458 v1(190.25,111.06) J33.3@190.25,116.122
I2C1.SDA_10: J4.18 J38.3 J87.3 | length 336.1
  Top Layer w0.203: v1(104.49,15.125) 267.812,15.125 273.38,20.693 273.38,110.445 272.417,111.408 209.571,111.408 v1(209.214,111.051)
  Bottom Layer w0.203: J4.18@104.481,11.315 v1@104.481,15.141
  Bottom Layer w0.254: J87.3@209.205,109.458 209.214,109.468 v1(209.214,111.051) ; v1@209.205,111.06 J38.3@209.205,116.122
I2C1.SDA_11: J4.19 J19.3 J51.3 | length 284.5
  Top Layer w0.203: v1@104.964,30.449 104.964,38.459 107.183,40.677 257.415,40.677 258.516,41.778 258.516,104.247 255.004,107.758 v1(228.315,107.758)
  Bottom Layer w0.203: J4.19@104.981,11.315 v1@104.981,30.449
  Bottom Layer w0.254: v1(228.315,107.758) J19.3@228.315,116.046
  other v1: 104.964,30.297
I2C1.SDA_12: J4.20 J24.3 J62.3 | length 268.5
  Top Layer w0.203: v1(105.468,30.619) 105.468,38.277 107.487,40.296 257.669,40.296 259.1,41.727 259.1,107.778 256.612,110.265 249.25,110.265 247.264,108.279 v1(247.264,108.262)
  Bottom Layer w0.203: J4.20@105.481,11.315 v1@105.481,30.619
  Bottom Layer w0.254: J62.3@247.23,109.484 247.264,109.517 247.264,111.899 247.247,111.915 247.247,116.131 J24.3@247.23,116.148
I2C1.SDA_13: J4.21 J29.3 J78.3 | length 262.5
  Top Layer w0.203: v1@105.963,30.466 105.963,38.061 107.741,39.839 257.847,39.839 259.608,41.6 259.608,106.959 v1@259.583,106.985
  Bottom Layer w0.203: v1@105.975,30.449 105.975,11.321 J4.21@105.981,11.315
  Bottom Layer w0.254: v1(259.608,106.985) 265.298,106.985 266.237,107.925 J78.3@266.237,109.458 J29.3@266.237,116.122
  other v1: 105.963,30.314
I2C1.SDA_14: J4.22 J34.3 J83.3 | length 172.1
  Top Layer w0.203: v1(59.346,85.66) 59.346,84.889 62.817,81.419 84.069,81.419 87.488,77.999 v1(87.488,62.673)
  Bottom Layer w0.203: J83.3@10.239,90.408 10.239,86.922 11.501,85.66 v1(59.346,85.66) ; v1(87.488,62.673) 87.488,51.868 89.256,50.1 92.451,50.1 97.937,44.614 97.937,32.473 99.207,31.203 106.217,31.203 106.481,30.939 J4.22@106.481,11.315
  Bottom Layer w0.254: J83.3@10.239,90.408 J34.3@10.239,97.072
I2C1.SDA_15: J4.23 J39.3 J88.3 | length 156.1
  Top Layer w0.203: v1(59.889,86.753) 59.889,85.054 63.084,81.858 84.289,81.858 87.988,78.159 v1(87.988,62.267)
  Bottom Layer w0.203: J88.3@29.205,90.434 29.205,88.296 30.748,86.753 v1(59.889,86.753) ; v1(87.988,62.267) 87.988,51.921 89.301,50.608 97.373,50.608 98.318,49.663 98.318,33.006 99.74,31.584 106.446,31.584 106.981,31.049 J4.23@106.981,11.315
  Bottom Layer w0.254: J88.3@29.229,90.434 J39.3@29.229,97.098
I2C1.SDA_16: J4.24 J20.3 J52.3 | length 137.7
  Top Layer w0.203: v1(60.37,87.769) 60.37,85.279 63.291,82.358 84.424,82.358 88.488,78.294 v1(88.488,62.673)
  Bottom Layer w0.203: J52.3@48.255,90.367 48.255,88.81 49.296,87.769 v1(60.37,87.769) ; v1(88.488,62.673) 88.488,52.056 89.555,50.989 97.531,50.989 98.699,49.821 98.699,33.184 99.893,31.99 106.598,31.99 107.481,31.107 J4.24@107.481,11.315
  Bottom Layer w0.254: J20.3@48.271,97.022 48.305,96.987 J52.3@48.305,90.367
I2C1.SDA_17: J4.33 J25.3 J66.3 | length 125.1
  Top Layer w0.203: v1(67.279,91.883) 79.719,91.883 79.75,91.853 92.099,91.853 96.438,87.514 105.573,78.379 v1(105.573,58.882)
  Bottom Layer w0.203: v1(105.573,58.882) 105.573,51.693 107.745,49.521 111.801,49.521 114.955,46.367 114.955,33.489 111.981,30.515 J4.33@111.981,11.315
  Bottom Layer w0.254: J66.3@67.27,90.408 J25.3@67.27,97.072
I2C1.SDA_18: J4.34 J30.3 J79.3 | length 106.8
  Top Layer w0.203: v1(86.284,92.332) 89.271,92.332 89.33,92.391 92.265,92.391 106.071,78.585 v1(106.071,58.457)
  Bottom Layer w0.203: v1@106.075,58.457 106.075,51.901 108.074,49.902 112.055,49.902 115.336,46.621 115.336,33.26 112.483,30.407 J4.34@112.483,11.317
  Bottom Layer w0.254: v1(86.284,92.332) 86.284,90.411 J79.3@86.286,90.408 ; v1@86.286,92.332 J30.3@86.286,97.072
I2C1.SDA_19: J4.35 J35.3 J84.3 | length 95
  Top Layer w0.203: v1(105.303,88.602) 103.708,87.007 103.708,81.652 106.476,78.884 106.476,68.956 106.569,68.863 v1(106.569,58.882)
  Bottom Layer w0.203: v1@106.573,58.882 106.573,52.107 108.397,50.283 112.334,50.283 115.768,46.849 115.768,33.133 112.981,30.347 J4.35@112.981,11.315
  Bottom Layer w0.254: v1(105.303,88.602) J84.3@105.303,90.545 ; J84.3@105.311,90.408 105.278,90.442 105.278,92.087 105.294,92.103 105.294,97.056 J35.3@105.311,97.072
I2C1.SDA_20: J4.36 J40.3 J89.3 | length 384.5
  Top Layer w0.203: v1(115.087,31.725) 115.087,35.374 118.105,38.391 258.279,38.391 261.132,41.244 v1(261.132,103.796) ; v1(124.328,101.256) 243.454,101.256 v1(245.994,103.796)
  Bottom Layer w0.203: J4.36@113.481,11.315 113.481,28.891 115.087,30.497 v1(115.087,31.725) ; J40.3@124.294,97.072 124.328,97.106 v1(124.328,101.256) ; v1(245.994,103.796) v1(261.132,103.796)
  Bottom Layer w0.254: J89.3@124.294,90.408 J40.3@124.294,97.072
I2C1.SDA_21: J4.37 J21.3 J56.3 | length 364.6
  Top Layer w0.203: v1(115.621,32.233) 115.621,35.323 118.282,37.985 258.558,37.985 261.64,41.066 v1(261.64,103.085) ; v1(143.251,100.316) 245.206,100.316 v1(248,103.11)
  Bottom Layer w0.203: J4.37@113.981,11.315 113.981,28.654 115.621,30.294 v1(115.621,32.233) ; J21.3@143.251,97.082 v1(143.251,100.316) ; v1(248,103.11) 261.615,103.11 v1(261.64,103.085)
  Bottom Layer w0.254: J56.3@143.241,90.408 J21.3@143.241,97.072
I2C1.SDA_22: J4.38 J26.3 J67.3 | length 343.6
  Top Layer w0.203: v1(116.23,32.791) 116.23,35.298 118.409,37.477 258.634,37.477 262.173,41.016 v1(262.173,98.894) ; v1(165.204,99.283) 170.391,94.096 170.687,94.096 170.803,93.98 244.56,93.98 v1(249.524,98.945)
  Bottom Layer w0.203: J4.38@114.481,11.315 114.481,28.367 116.23,30.116 v1(116.23,32.791) ; J26.3@162.258,97.098 162.258,98.783 162.757,99.283 v1(165.204,99.283) ; v1(249.524,98.945) 262.069,98.945 262.12,98.894 v1(262.173,98.894)
  Bottom Layer w0.254: J67.3@162.258,90.434 J26.3@162.258,97.098
I2C1.SDA_23: J4.39 J31.3 J80.3 | length 330.4
  Top Layer w0.203: v1(116.713,33.655) 116.713,35.154 118.63,37.07 258.888,37.07 262.656,40.838 v1@262.656,105.117
  Bottom Layer w0.203: J4.39@114.97,11.321 114.97,28.271 116.713,30.014 v1(116.713,33.655) ; J31.3@181.3,97.098 181.3,100.35 182.155,101.205 186.616,101.205 190.579,105.168 v1(262.656,105.168)
  Bottom Layer w0.254: J80.3@181.3,90.434 J31.3@181.3,97.098
I2C1.SDA_24: J4.40 J36.3 J85.3 | length 305.4
  Top Layer w0.203: v1(117.25,34.784) 119.104,36.638 259.092,36.638 263.164,40.711 v1(263.164,100.824)
  Bottom Layer w0.203: J4.40@115.481,11.315 115.481,28.148 117.25,29.916 v1(117.25,34.784) ; J36.3@200.282,97.098 200.282,99.892 201.213,100.824 v1@263.113,100.824
  Bottom Layer w0.254: J85.3@200.282,90.434 J36.3@200.282,97.098
I2C1.SDA_25: J4.49 J41.3 J90.3 | length 280.1
  Top Layer w0.203: v1(125.013,31.685) 125.013,32.828 125.598,33.413 143.276,33.413 149.016,27.672 155.549,27.672 160.807,22.414 260.294,22.414 v1(266.237,28.358) ; v1(219.298,88.632) 218.313,87.647 217.5,86.834 217.5,80.702 219.857,78.345 v1(251.277,78.345)
  Bottom Layer w0.203: J4.49@119.981,11.315 119.981,26.653 v1(125.013,31.685) ; v1(251.277,78.345) 266.237,63.385 v1(266.237,28.358)
  Bottom Layer w0.254: v1(219.298,88.632) J90.3@219.298,90.4 ; J90.3@219.306,90.408 J41.3@219.306,97.072
I2C5.SCL_26: J1.4 J4.58 J91.4 | length 191.3
  Top Layer w0.203: v1(128.671,33.895) v1(134.97,33.895) ; v1(134.97,46.798) 136.189,48.018 150.134,48.018 v1(152.776,45.376) ; v1(236.494,79.158) 236.494,85.965 v1(240.812,90.283)
  Bottom Layer w0.203: J4.58@124.481,11.315 124.481,25.878 128.671,30.068 v1(128.671,33.895) ; v1(134.97,33.895) v1(134.97,46.798) ; v1(152.776,45.376) 156.484,49.084 214.655,49.084 227.558,61.988 235.199,61.988 236.494,63.283 v1(236.494,79.158)
  Bottom Layer w0.254: J1.4@238.78,97.072 238.78,94.656 238.929,94.507 240.372,94.507 240.779,94.101 J91.4@240.779,92.25 ; v1@240.82,90.283 J91.4@240.82,92.208
I2C5.SCL_27: J4.59 J5.4 J96.4 | length 183.4
  Bottom Layer w0.203: 15.243,69.981 15.971,69.252 23.211,69.252 29.18,63.283 122.753,63.283 123.947,62.089 123.947,49.719 126.182,47.484 132.552,47.484 133.185,46.851 133.185,34.015 124.981,25.811 J4.59@124.981,11.315
  Bottom Layer w0.254: J5.4@13.244,78.073 13.244,75.764 13.609,75.399 14.945,75.399 15.243,75.101 15.243,73.209 15.243,69.981
I2C5.SCL_28: J4.60 J8.4 J101.4 | length 164.8
  Bottom Layer w0.203: J101.4@36.224,73.25 36.224,70.259 39.974,66.509 123.769,66.509 124.353,65.925 124.353,49.973 126.461,47.865 132.71,47.865 133.566,47.009 133.566,33.786 131.338,31.558 125.481,25.702 J4.60@125.481,11.315
  Bottom Layer w0.254: J8.4@34.226,78.073 34.226,75.657 34.375,75.508 35.818,75.508 36.224,75.101 J101.4@36.224,73.25
I2C5.SCL_29: J4.61 J11.4 J106.4 | length 147.6
  Bottom Layer w0.203: J106.4@55.306,73.209 55.306,69.109 56.179,68.236 124.048,68.236 124.836,67.449 124.836,50.177 126.766,48.246 132.887,48.246 133.972,47.162 133.972,33.634 125.981,25.643 J4.61@125.981,11.315
  Bottom Layer w0.254: J11.4@53.266,78.073 53.266,75.657 53.415,75.508 54.859,75.508 55.265,75.101 J106.4@55.265,73.25
I2C5.SCL_30: J4.62 J14.4 J110.4 | length 129
  Bottom Layer w0.203: J14.4@72.258,78.073 72.258,75.657 72.406,75.508 73.85,75.508 74.256,75.101 74.256,69.489 75.102,68.642 124.226,68.642 125.369,67.499 125.369,50.329 127.071,48.627 133.091,48.627 134.429,47.289 134.429,33.507 126.481,25.559 J4.62@126.481,11.315
I2C5.SCL_31: J2.4 J4.63 J92.4 | length 111
  Bottom Layer w0.203: J92.4@93.205,73.225 93.205,69.793 93.949,69.049 124.429,69.049 125.826,67.652 125.826,50.507 127.274,49.059 133.853,49.059 135.484,47.428 135.484,30.116 126.981,21.614 J4.63@126.981,11.315
  Bottom Layer w0.254: J2.4@91.206,78.048 91.206,75.78 91.587,75.399 92.781,75.399 93.205,74.975 J92.4@93.205,73.225
I2C5.SCL_32: J4.64 J6.4 J97.4 | length 92.1
  Bottom Layer w0.203: J97.4@112.296,73.234 112.296,70.387 113.253,69.43 124.632,69.43 126.233,67.83 126.233,50.837 127.63,49.44 134.127,49.44 135.865,47.703 135.865,29.938 127.481,21.555 J4.64@127.481,11.315
  Bottom Layer w0.254: J6.4@110.256,78.099 110.256,75.682 110.405,75.533 111.848,75.533 112.255,75.127 J97.4@112.255,73.276
I2C5.SCL_33: J4.73 J9.4 J102.4 | length 122.8
  Top Layer w0.203: v1(127.198,58.957) 126.139,58.957 122.905,62.191 122.905,75.018 127.757,79.869 v1(129.255,79.869) ; v1(136.291,48.703) 150.337,48.703 153.258,45.782 v1(155.265,45.782)
  Bottom Layer w0.203: v1(127.198,58.957) 127.198,51.142 128.112,50.227 134.767,50.227 v1(136.291,48.703) ; v1(129.255,79.869) v1@129.264,79.861 ; J9.4@129.264,78.082 J9.4@129.273,78.073 ; J4.73@131.981,11.374 131.981,21.407 141.32,30.746 150.744,30.746 153.436,33.438 153.436,43.954 v1(155.265,45.782)
  Bottom Layer w0.254: J9.4@129.264,78.082 v1@129.264,79.861 ; J9.4@129.273,78.073 129.273,75.657 129.421,75.508 130.865,75.508 131.271,75.101 J102.4@131.271,73.25
I2C5.SCL_34: J4.74 J12.4 J107.4 | length 328.7
  Top Layer w0.203: v1(147.289,30.212) 149.448,28.053 155.773,28.053 161.031,22.795 259.913,22.795 266.825,29.707 v1(268.396,29.707)
  Bottom Layer w0.203: J4.74@132.481,11.374 132.481,21.348 141.346,30.212 v1(147.289,30.212) ; J12.4@148.119,77.997 148.119,81.659 148.59,82.13 251.531,82.13 268.396,65.264 v1(268.396,29.707)
  Bottom Layer w0.254: J12.4@148.119,77.997 148.119,75.58 148.268,75.432 149.712,75.432 150.118,75.025 J107.4@150.118,73.174
I2C5.SCL_35: J4.75 J15.4 J111.4 | length 305.8
  Top Layer w0.203: v1(148.102,30.212) 149.88,28.434 156.027,28.434 161.285,23.176 259.659,23.176 266.672,30.19 v1(267.838,30.19)
  Bottom Layer w0.203: J4.75@132.981,11.374 132.981,21.264 141.447,29.73 147.619,29.73 v1(148.102,30.212) ; J15.4@167.279,78.073 167.279,80.784 167.863,81.368 251.353,81.368 267.838,64.883 v1(267.838,30.19)
  Bottom Layer w0.254: J15.4@167.279,78.073 167.279,75.657 167.428,75.508 168.871,75.508 169.278,75.101 J111.4@169.278,73.25
I2C5.SCL_36: J3.4 J4.76 J93.4 | length 283.2
  Top Layer w0.203: v1(148.915,30.085) 148.915,30.06 150.109,28.866 156.215,28.866 161.524,23.557 259.354,23.557 266.466,30.669 v1(267.304,30.669)
  Bottom Layer w0.203: J4.76@133.481,11.374 133.481,21.154 141.676,29.349 148.178,29.349 v1(148.915,30.085) ; J3.4@186.28,78.073 186.28,80.169 186.691,80.58 251.139,80.58 267.304,64.415 v1(267.304,30.669)
  Bottom Layer w0.254: J3.4@186.28,78.073 186.28,75.657 186.428,75.508 187.872,75.508 188.278,75.101 J93.4@188.278,73.25
I2C5.SCL_37: J4.77 J7.4 J98.4 | length 257.4
  Top Layer w0.203: v1(150.083,30.263) 152.268,32.447 v1(158.795,32.447) ; v1(158.795,31.355) 163.444,26.707 179.293,26.707 183.459,30.873 260.319,30.873 v1(261.005,31.558)
  Bottom Layer w0.203: J4.77@133.981,11.374 133.981,20.994 141.93,28.942 148.737,28.942 150.058,30.263 v1(150.083,30.263) ; v1(158.795,31.355) v1@158.795,32.524 ; J7.4@205.279,78.048 205.279,79.566 205.531,79.818 248.889,79.818 265.653,63.054 265.653,32.727 264.485,31.558 v1(261.005,31.558)
  Bottom Layer w0.254: J7.4@205.279,78.048 205.279,75.631 205.428,75.482 206.871,75.482 207.277,75.076 J98.4@207.277,73.225
I2C5.SCL_38: J4.78 J10.4 J103.4 | length 148.3
  Top Layer w0.203: v1(156.103,45.935) v1(156.103,50.078) ; v1(162.377,60.641) v1(214.447,60.641)
  Bottom Layer w0.203: J4.78@134.481,11.374 134.481,20.859 142.133,28.51 149.067,28.51 153.868,33.311 153.868,43.7 v1@156.102,45.934 ; v1(156.103,50.078) 161.389,50.078 162.377,51.066 v1(162.377,60.641)
  Bottom Layer w0.254: v1(214.447,60.641) 214.447,61.454 220.113,67.12 225.47,67.12 226.267,67.917 226.267,74.383 ; J10.4@224.261,78.073 224.261,75.657 224.409,75.508 225.853,75.508 226.259,75.101 J103.4@226.259,73.25